# Altium PCB Industrial_IOT_Dev_Brd-v1.0.PcbDoc (part 6 of 8)
Units mil, origin at the board's own origin, x right, y up, seen from the top; angles counter-clockwise.
Board outline 6299.21 x 4724.41 mil, 4 copper layers (Top Layer, Layer 1, Layer 2, Bottom Layer), stack 62.047 mil thick; 376 components, 240 nets, 1129 pads, 635 vias.
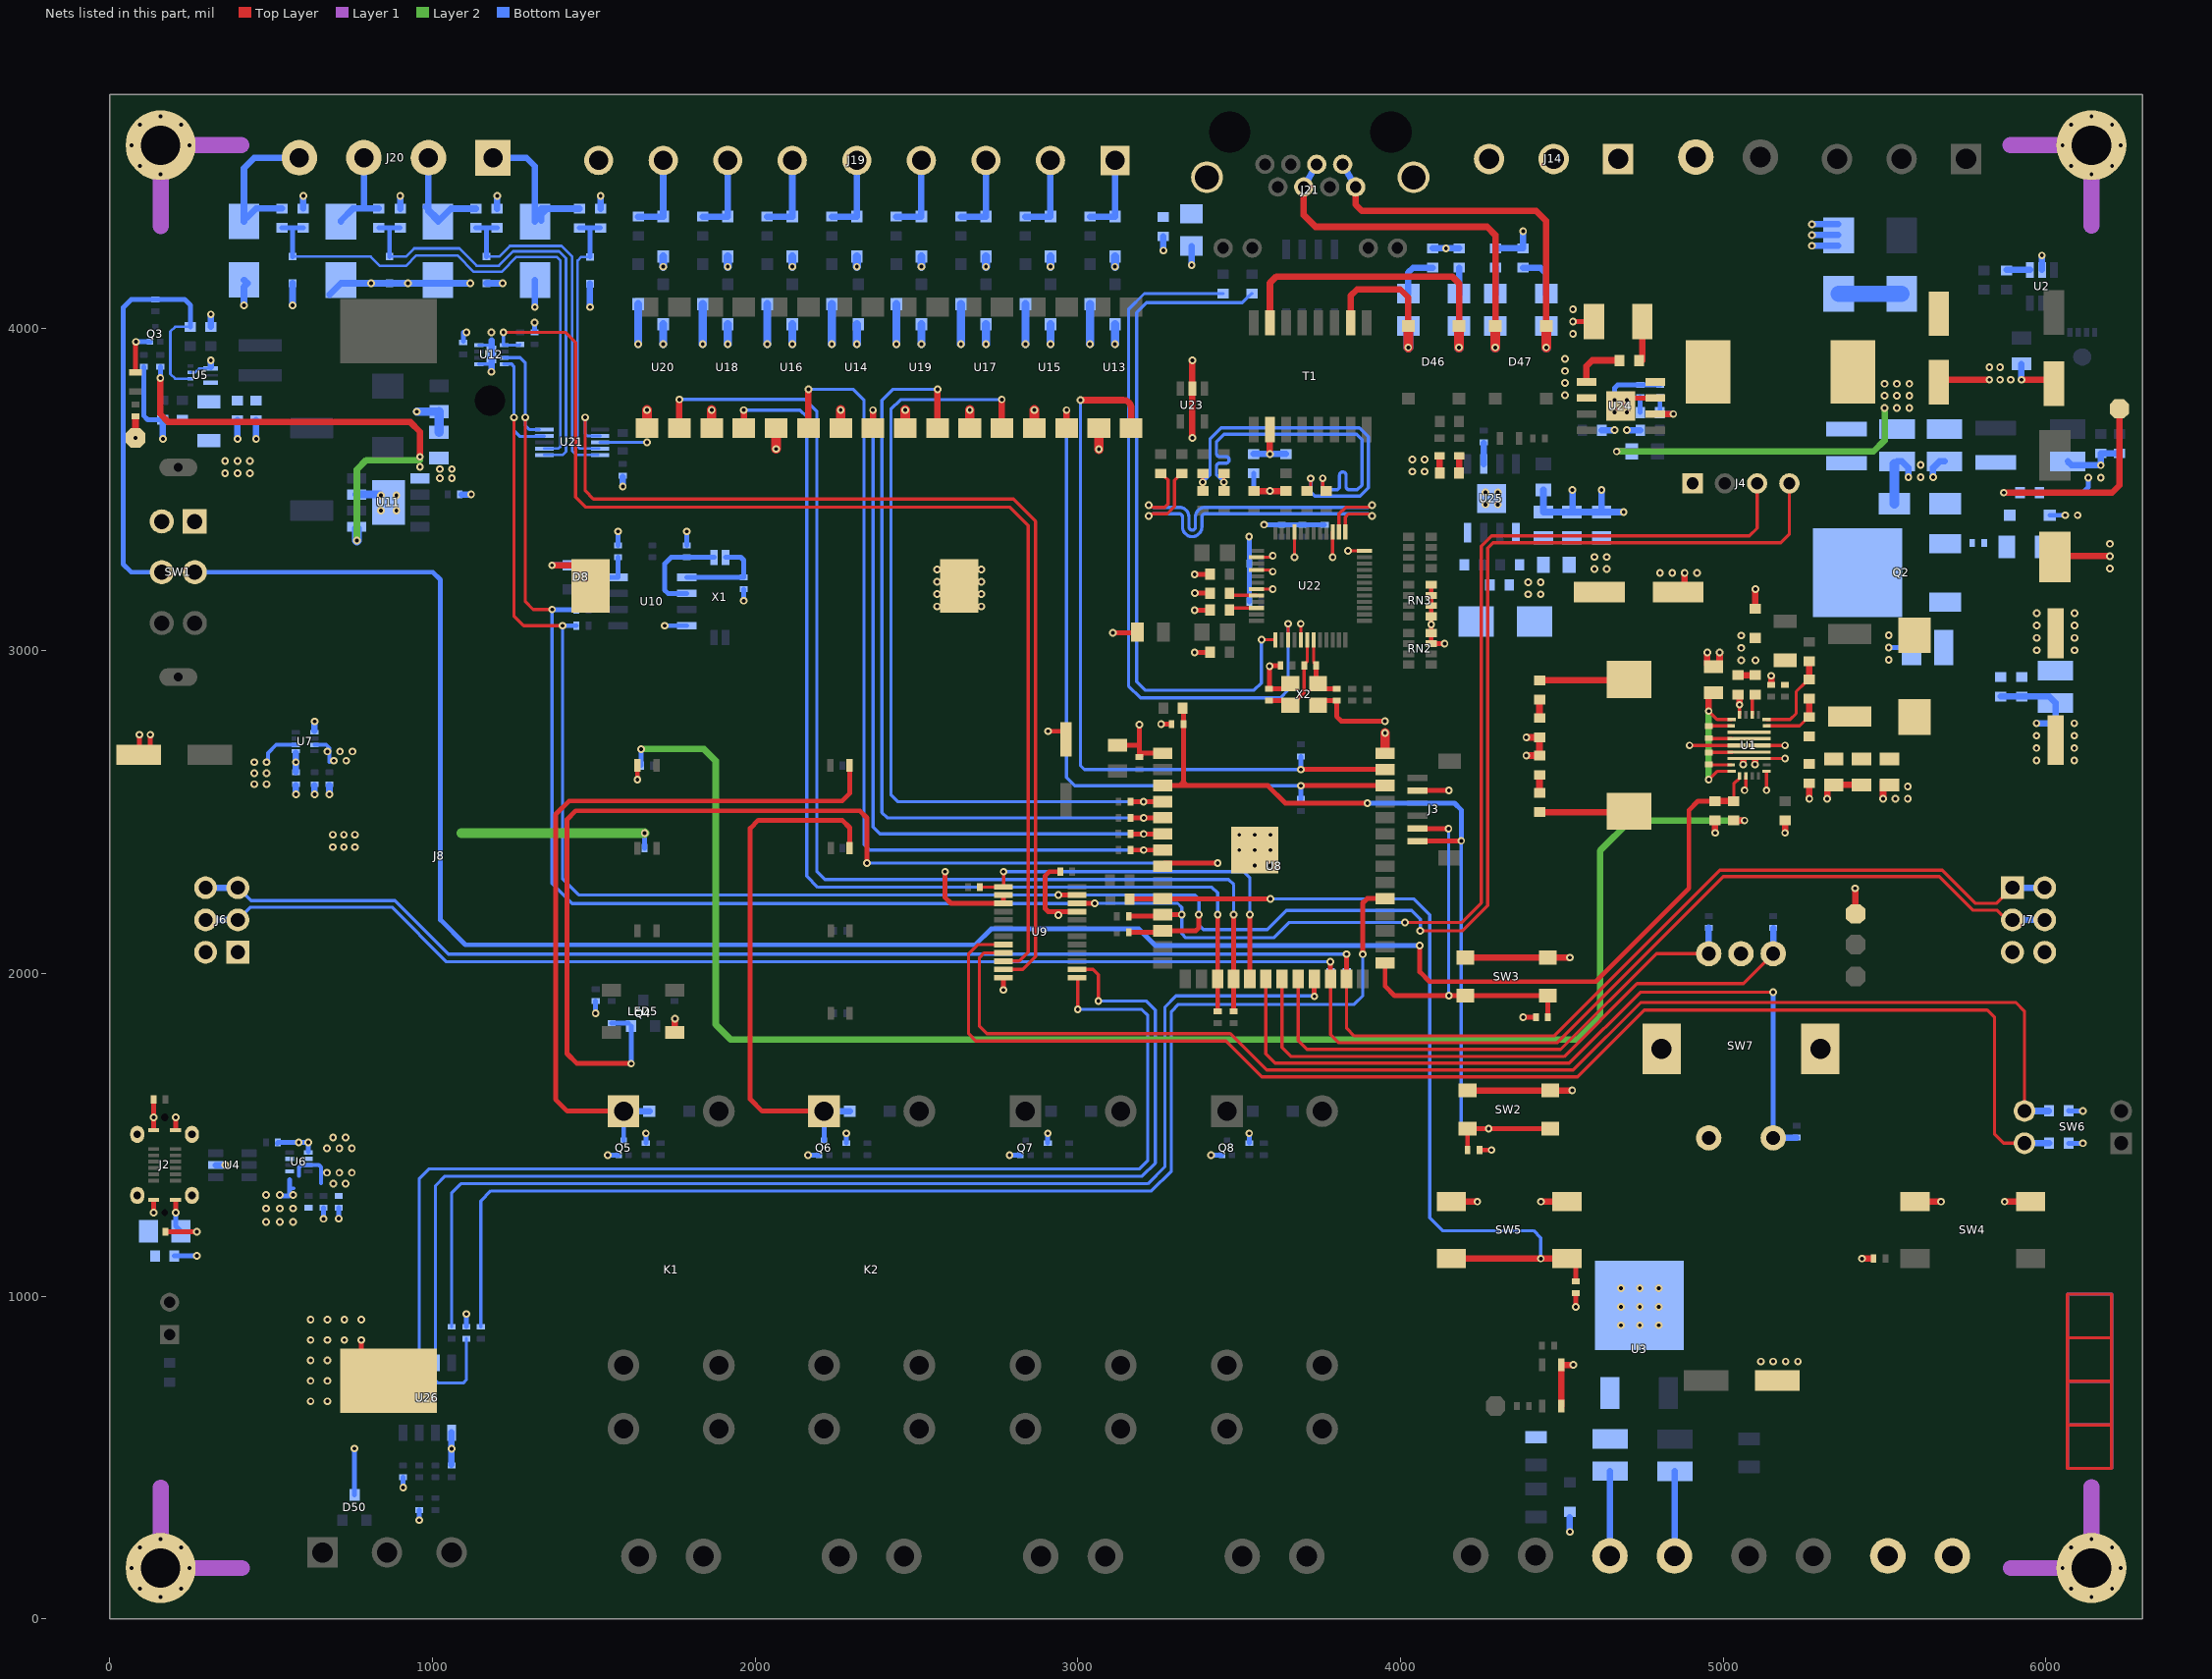
[diagram p5: the nets of this part, all layers, seen from the top]

## Via types
v1: diameter 23.62, hole 11.81, Top Layer to Bottom Layer, tented both sides, 635 vias

## Nets (pads, with @x,y where several pads share a name; then routed paths per layer and width w, separated by ;. In a path a pad name is that pad's centre, name@x,y a point inside that pad or via, vN(x,y) a via of type N, cw(c..) or ccw(c..) an arc to the next point about the centre after c; other vN are vias at no path point) (continued)
5V-BOOST: F4.2 R27.1 TP4.1 U7.6 | length 158.7
  Top Layer w20: TP4.1@80,3687.98 R27.1@80,3721.69
  Bottom Layer w12: v1@490.49,2654.94 490.49,2682.91 515.87,2708.3 U7.6@577,2708.3
  other v1: 448.4,2586.76 486.49,2586.76 448.4,2620.85 486.49,2620.85 448.4,2654.94 486.49,2654.94 357.72,3550.45 396,3550.45 434.28,3550.45 357.72,3587.82 396,3587.82 434.28,3587.82 80,3659.65
5V-OR: C42.1 R18.2 R23.1 R25.2 R47.1 U6.2 U6.7 U7.3 U7.5 U11.1 U11.5 | length 2318.3
  Top Layer w20: v1(157.06,3845.47) 157.06,3733.28 181.85,3708.49 931.82,3708.49 961.66,3678.65 v1(961.66,3600.96)
  Layer 2 w20: v1(766,3342) 766,3561.77 795.2,3590.96 v1@961.66,3590.96
  Layer 2 w30: 1089.17,2434.74 v1(1658.02,2434.74)
  Bottom Layer w8: U11.5@765.57,3384.41 765.97,3384.01 U11.5@765.97,3377.77
  Bottom Layer w12: U7.3@634.87,2708.3 671,2708.3 680.94,2698.36 680.94,2654.94
  Bottom Layer w15: v1(157.06,3845.47) R23.1@157.06,3880.25 ; R47.1@1657.7,2388.54 1657.86,2388.71 1657.86,2434.57 v1(1658.02,2434.74)
  Bottom Layer w20: R25.2@577,2625.05 v1(577,2654.94) U7.5@577,2684.17 ; v1@680.97,2554.98 R18.2@680.97,2583.33
  Bottom Layer w30: v1(766,3342) U11.5@766,3377.74
  other v1: 673.26,1458.3 711.84,1458.3 750.41,1458.3 692.27,1492.07 730.85,1492.07 691.82,2391.91 725.91,2391.91 760,2391.91 691.82,2430 725.91,2430 760,2430 681.01,2554.94 694.42,2659.4 732.99,2659.4 674.86,2688.17 713.43,2688.17 752,2688.17 1022.9,3535.17 1060.27,3535.17 1022.9,3563 1060.27,3563 961.66,3570.02
5V-PWR: D3.2 F2.2 R3.2 R17.2 R24.2 TP2.1 U6.3 U6.5 | length 323.4
  Top Layer w10: TP2.1@5409,2186 TP2.1@5410,2185
  Top Layer w20: TP2.1@5409,2186 v1(5409,2264)
  Bottom Layer w10: 557.41,1337.41 ccw(c560,1337.41) 560,1334.82 570.52,1334.82
  Bottom Layer w12: 586.34,1372.64 586.34,1395.97 cw(c596.6,1395.97) 596.6,1406.22 U6.3@615.28,1406.22 645.15,1406.22 cw(c645.15,1395.97) 655.41,1395.97 655.41,1350.02
  Bottom Layer w15: v1@527.91,1311 555.34,1311 ccw(c555.34,1313.06) 557.41,1313.06 557.41,1337.41 557.41,1361.76
  other v1: 485,1230.18 526.91,1230.18 568.29,1230.18 485,1272.09 526.91,1272.09 568.29,1272.09 485,1313.99 526.91,1313.99 568.29,1313.99 692.83,1349.07 731.4,1349.07 673.26,1382.84 711.84,1382.84 750.41,1382.84 5056.22,2970.84 5099.73,2970.84 5056.22,3009.12 5056.22,3047.41
24V: C8.1 C9.2 C10.2 C20.2 C21.2 D6.1 Q2.3 R1.2 R7.1 U1.7 | length 5014.5
  Top Layer w10: U1.7@5141.82,2666.02 v1(5191.66,2666.02)
  Top Layer w20: R1.2@5032.84,2474.1 v1(5065.92,2474.1) ; v1(5062.13,2647.51) 5062.13,2660.78 ; v1(5098.66,2647.52) 5098.66,2660.61
  Layer 2 w20: v1(1646.45,2695.5) 1841.5,2695.5 1878,2659 1878,1842 1925.13,1794.87 4547.87,1794.87 4618,1865 4618,2380 4712.1,2474.1 v1(5065.92,2474.1)
  Bottom Layer w15: R7.1@1646.45,2644.45 v1(1646.45,2695.5)
  other v1: 5971.78,3001.72 6089,3001.72 5971.78,3040 6089,3040 5971.78,3078.28 6089,3078.28 5971.78,3116.56 6089,3116.56
24V-ADAP: D2.2 D6.2 F1.2 R9.2 R10.2 TP1.1 | length 605.1
  Top Layer w20: v1(5869.29,3490) 6205,3490 6227.73,3512.73 TP1.1@6227.73,3750
24V-POE: F7.2 Q2.2
24V_EN: R1.1 R4.2 SW1.2 U1.1 | length 6450
  Top Layer w10: R1.1@5027.83,2534.1 R1.1@5032.84,2534.1 ; R1.1@5027.83,2539.11 R1.1@5030.34,2536.61 ; R1.1@5032.83,2539.11 5032.83,2587.93 U1.1@5049.88,2604.98
  Top Layer w15: v1(4059.83,2086.51) 4059.83,2005.17 4090,1975 4605,1975 4893.87,2263.87 4893.87,2506.22 4921.76,2534.11 R4.2@4975.04,2534.11
  Top Layer w20: R4.2@4975.04,2534.11 R1.1@5027.83,2534.1
  Bottom Layer w15: SW1.2@263.91,3243.53 1001.55,3243.53 1025.05,3220.03 1025.05,2166.21 1102.14,2089.12 2682.26,2089.12 2731.29,2138.15 3189.22,2138.15 3240.86,2086.51 v1(4059.83,2086.51)
485_DE: R123.1 U9.14 U26.3 | length 3910.5
  Top Layer w10: U9.14@2997.73,2012.85 3047.52,2012.85 3064,1996.37 v1(3064,1914.72)
  Bottom Layer w10: R123.1@1105,868.63 1105,740.46 1095.62,731.07 1017.53,731.07 1009.46,739.15 1009.46,1342.47 1038.85,1371.86 3199.08,1371.86 3239.96,1412.74 3239.96,1887.3 3212.55,1914.72 v1(3064,1914.72)
485_RE: U9.13 U26.2 | length 3625.5
  Top Layer w10: U9.13@2997.73,1987.26 3000,1984.99 v1(3000,1888.81)
  Bottom Layer w10: U26.2@959.46,793.4 959.46,1365.3 988.64,1394.49 3189.85,1394.49 3217,1421.64 3217,1870.27 3198.46,1888.8 v1@3000.01,1888.8
#RD_N: C55.2 R90.1 R94.2 | length 1156.3
  Top Layer w10: R94.2@3452.71,3495 3452.64,3495.07 v1(3452.64,3522.25) 3452.64,3549.39 C55.2@3452.71,3549.46 ; R90.1@3758.81,3495.21 v1@3758.81,3534.26
  Bottom Layer w10: v1(3452.64,3522.25) 3429.83,3545.06 3429.83,3546.56 3429.83,3571.56 cw(c3439.83,3571.56) 3439.83,3581.56 3458.89,3581.56 ccw(c3458.89,3591.56) 3458.89,3601.56 3439.83,3601.56 cw(c3439.83,3611.56) 3429.83,3611.56 3429.83,3642.98 3429.83,3648.19 3452.64,3671.01 3864.19,3671.01 3880.64,3654.56 3880.64,3513.55 3866.15,3499.05 3841.15,3499.05 cw(c3841.15,3509.05) 3831.15,3509.05 3831.15,3544.32 ccw(c3821.15,3544.32) 3811.15,3544.32 3811.15,3509.05 cw(c3801.15,3509.05) 3801.15,3499.05 3776.61,3499.05 3767.54,3499.05 3758.81,3507.78 v1@3758.81,3541.28
  other v1: 3759.02,3534.46
#RD_P: C56.2 R91.1 R93.2 | length 1154.6
  Top Layer w10: R93.2@3387.4,3495 C56.2@3387.39,3549.47 ; R91.1@3721.96,3495 v1(3721.96,3534.26)
  Bottom Layer w10: v1(3387.01,3522.25) 3409.83,3545.06 3409.83,3656.48 3444.35,3691.01 3872.48,3691.01 3900.64,3662.84 3900.64,3505.26 3874.43,3479.05 3734.83,3479.05 3722.14,3491.75 v1@3722.14,3539.95
#TD_N: R92.2 U22.1 | length 1146.6
  Top Layer w10: v1(3220,3417.82) cw(c3236.44,3401.38) 3229.41,3423.54 cw(c3236.44,3401.38) 3236.44,3424.63 3277.6,3424.63 3299.96,3446.99 3299.96,3515.56 3299.96,3528.66 3310.08,3538.78 3310.08,3539.48 3320.08,3549.48 R92.2@3322.58,3549.48 ; U22.1@3829.07,3368.6 3829.07,3414.6 3838.61,3424.14 3912.14,3424.14 v1(3912.14,3417.82)
  Bottom Layer w10: v1(3220,3417.82) ccw(c3220,3426.72) 3226.29,3420.43 cw(c3236.44,3410.28) 3236.44,3424.63 3257.02,3424.63 3314.51,3424.63 cw(c3314.51,3414.63) 3324.51,3414.63 3324.51,3383.96 ccw(c3354.51,3383.96) 3384.51,3383.96 3384.51,3414.63 cw(c3394.51,3414.63) 3394.51,3424.63 3409.51,3424.63 3896.83,3424.63 cw(c3896.83,3413) 3905.05,3421.23 3905.85,3420.43 ccw(c3912.14,3426.72) v1(3912.14,3417.82)
#TD_P: R95.2 U22.2 | length 1123.8
  Top Layer w10: v1(3220,3451.44) ccw(c3236.44,3467.89) 3229.41,3445.72 ccw(c3236.44,3467.89) 3236.44,3444.63 3269.32,3444.63 3279.96,3455.27 3279.96,3507.28 3279.96,3529.23 3269.83,3539.35 3269.83,3539.48 3259.83,3549.48 R95.2@3257.33,3549.48 ; 3809.07,3392.62 3809.07,3424.28 3829.92,3445.12 3912.14,3445.12 v1(3912.14,3451.44)
  Bottom Layer w10: v1(3220,3451.44) cw(c3220,3442.54) 3226.29,3448.84 ccw(c3236.44,3458.99) 3236.44,3444.63 3257.02,3444.63 3314.51,3444.63 cw(c3314.51,3414.63) 3344.51,3414.63 3344.51,3383.96 ccw(c3354.51,3383.96) 3364.51,3383.96 3364.51,3414.63 cw(c3394.51,3414.63) 3394.51,3444.63 3409.51,3444.63 3896.83,3444.63 ccw(c3896.83,3456.26) v1@3905.05,3448.03 ; v1@3905.05,3448.04 3905.85,3448.84 cw(c3912.14,3442.54) v1(3912.14,3451.44)
ACTLED: R101.1 U22.27 | length 2260
  Top Layer w10: U22.27@3651.91,3033.95 v1@3651.91,3088.63
  Bottom Layer w10: R101.1@3450.32,4106.89 3206.1,4106.89 3157.33,4058.12 3157.33,2891.33 3194.23,2854.43 3628.16,2854.43 3651.53,2877.8 v1(3651.53,3084.01)
ADC_RDY: U9.11 U21.2 | length 3226.9
  Top Layer w10: v1(1473.66,3723) 1473.66,3495.43 1499.09,3470 2800.35,3470 2868.98,3401.37 2868.98,2052.42 2829.41,2012.85 U9.11@2769.38,2012.85
  Bottom Layer w10: v1(1473.66,3723) 1473.66,3671.82 1479.52,3665.96 U21.2@1520.14,3665.96
ADDR-1: R29.2 SW6.4 U9.8 | length 4239.9
  Top Layer w10: U9.8@2769.38,2089.62 2689.39,2089.62 2661.56,2061.79 2661.56,1813.13 2683.92,1790.77 3459.74,1790.77 3570.51,1680 4548.49,1680 4754.88,1886.39 5818.22,1886.39 5840.88,1863.72 5840.88,1501.74 5868.53,1474.1 SW6.4@5933.53,1474.1
  Bottom Layer w20: SW6.4@5933.53,1474.1 R29.2@6010,1474.1
ADDR-2: R30.2 SW6.3 U9.9 | length 4071.7
  Top Layer w10: U9.9@2769.38,2064.03 2709.96,2064.03 2695,2049.07 2695,1836.86 2718.05,1813.81 3472.56,1813.81 3585.5,1700.87 4535.19,1700.87 4744.57,1910.25 5906.73,1910.25 5933.53,1883.45 SW6.3@5933.53,1574.1
  Bottom Layer w10: R30.2@6009.1,1574.1 R30.2@6010,1575
  Bottom Layer w20: SW6.3@5933.53,1574.1 R30.2@6009.1,1574.1
AN0: D39.2 R80.1 R82.2 U21.4 | length 843.3
  Bottom Layer w8: D39.2@1488.24,4220.26 1460.88,4220.26 1449.85,4209.23 1449.85,3633.96 1457.22,3626.59 U21.4@1517.24,3626.59
  Bottom Layer w15: R80.1@1455.29,4310.14 1488.24,4310.14 ; D39.2@1488.24,4221.42 1488.24,4310.14 ; R82.2@1521.2,4310.14 1488.24,4310.14
AN1: D43.2 R84.1 R86.2 U21.5 | length 1135.8
  Bottom Layer w8: D43.2@1167.75,4221.6 1207.44,4221.6 1240.4,4254.56 1400.35,4254.56 1432.85,4222.07 1432.85,3619.64 1445.59,3606.9 U21.5@1514.24,3606.9
  Bottom Layer w15: R84.1@1134.8,4310.14 1167.75,4310.14 ; D43.2@1167.75,4221.6 1167.75,4310.14 ; R86.2@1200.71,4310.14 1167.75,4310.14
AN2: D40.2 R81.1 R83.2 U21.6 | length 1431.5
  Bottom Layer w8: D40.2@867.26,4221.6 918.24,4221.6 943.43,4246.79 1083.43,4246.79 1136.96,4193.26 1205.69,4193.26 1250.22,4237.79 1392.18,4237.79 1413.91,4216.05 1413.91,3616.91 1403.91,3606.9 U21.6@1346.91,3606.9
  Bottom Layer w15: R81.1@834.3,4310.14 867.26,4310.14 ; D40.2@867.26,4221.6 867.26,4310.14 ; R83.2@900.21,4310.14 867.26,4310.14
AN3: D44.2 R85.1 R87.2 U21.7 | length 1683.9
  Bottom Layer w8: D44.2@566.76,4221.6 809.26,4221.6 838.1,4192.76 917.73,4192.76 950.28,4225.31 1077.34,4225.31 1128.11,4174.54 1214.16,4174.54 1260.4,4220.79 1385.14,4220.79 1396.91,4209.01 1396.91,3633.05 1390.46,3626.59 U21.7@1346.91,3626.59
  Bottom Layer w15: R85.1@533.81,4310.33 566.76,4310.33 ; D44.2@566.76,4221.6 566.76,4310.33 ; R87.2@599.72,4310.33 566.76,4310.33
ANALOG_IN_1: D37.2 J20.1 R80.2 | length 520
  Bottom Layer w20: J20.1@1187.67,4527.64 1291.83,4527.64 1317.67,4501.8 D37.2@1317.67,4330.03 ; D37.2@1317.67,4332.9 D37.2@1337.67,4352.9 ; D37.2@1337.67,4332.9 D37.2@1337.67,4352.9 ; R80.2@1455.29,4370.14 D37.2@1354.91,4370.14 ; D37.2@1337.67,4352.9 D37.2@1354.91,4370.14 ; D37.2@1337.67,4352.9 1337.67,4370.14 D37.2@1354.91,4370.14
ANALOG_IN_2: D41.2 J20.2 R84.2 | length 404.5
  Bottom Layer w20: D41.2@979.39,4375.14 979.93,4375.14 D41.2@987.67,4367.41 ; J20.2@987.67,4527.64 D41.2@987.67,4367.41 ; R84.2@1134.8,4370.14 1057.3,4370.14 D41.2@1018.29,4331.14 ; D41.2@987.67,4367.41 987.67,4361.77 D41.2@1017.18,4332.26 ; D41.2@987.67,4367.41 1017.18,4337.9 D41.2@1017.18,4332.26 ; D41.2@1017.18,4332.26 D41.2@1017.18,4330.03 D41.2@1018.29,4331.14 ; D41.2@1017.18,4332.26 D41.2@1018.29,4331.14
ANALOG_IN_3: D38.2 J20.3 R81.2 | length 293.4
  Bottom Layer w20: D38.2@716.68,4330.03 716.68,4332.97 753.93,4370.21 787.67,4370.21 ; J20.3@787.67,4527.64 787.67,4370.21 ; R81.2@834.25,4370.21 787.67,4370.21
ANALOG_IN_4: D42.2 J20.4 R85.2 | length 473.1
  Bottom Layer w20: D42.2@416.19,4330.21 416.19,4340.33 416.19,4495.83 448,4527.64 J20.4@587.67,4527.64 ; D42.2@423.44,4340.33 453.44,4370.33 R85.2@533.81,4370.33
BAT_ALERT: R50.2 U9.10 U12.5 | length 3658
  Top Layer w10: v1(1220.21,3986.5) 1413.5,3986.5 1443.82,3956.18 1443.82,3476.18 1475,3445 2790,3445 2846.34,3388.66 2846.34,2066.34 2818.44,2038.44 U9.10@2769.38,2038.44
  Bottom Layer w8: R50.2@1269.85,3947.35 R50.2@1272,3949.5
  Bottom Layer w10: v1@1218.21,3986.5 1220.1,3984.6 1220.1,3948.25 1221.01,3947.35 U12.5@1222,3947.35 R50.2@1269.85,3947.35
BAT_EN: R16.2 R19.2 SW1.5 U5.5 | length 1485.8
  Bottom Layer w8: U5.5@250.28,3843.26 202.83,3843.26 188,3858.09 188,3989.01 202.83,4003.84 R16.2@250.28,4003.84
  Bottom Layer w15: SW1.5@161.55,3243.53 66.77,3243.53 41.95,3268.35 41.95,4063.79 66.66,4088.5 R19.2@141.31,4088.5 232.42,4088.5 250.28,4070.64 R16.2@250.28,4003.84
BCK_BUT: C38.2 R40.1 SW5.3 SW5.4 U8.10 | length 2746.8
  Top Layer w15: R40.1@3157.58,2230.53 3158.58,2231.53 U8.10@3262.29,2231.53 ; U8.10@3263.26,2227.49 3266.77,2231 v1(3597,2231) ; C38.2@4543.58,1046.78 SW5.4@4543.59,1107.87
  Top Layer w20: SW5.3@4157.45,1116.68 v1(4434.65,1116.68) SW5.4@4515.71,1116.68
  Bottom Layer w10: v1(3597,2231) 4041.98,2231 4090.84,2182.14 4090.84,1242.89 4130.51,1203.21 4412.43,1203.21 4434.65,1181 v1(4434.65,1116.68)
CDB: R107.1 U25.6 | length 65.2
  Bottom Layer w20: U25.6@4257.92,3578.66 R107.1@4257.92,3643.9
DI_1: R64.1 U8.39 U13.4 | length 2356
  Top Layer w10: U8.39@3951.99,2632.25 U8.39@3952.27,2632.53
  Top Layer w15: v1@3691.26,2632.26 U8.39@3951.98,2632.26
  Top Layer w20: v1(3008.31,3776.77) 3140.57,3776.77 cw(c3140.57,3752.03) 3165.31,3752.03 U13.4@3165.31,3689.94 ; v1(3691,2632) v1@3691.26,2632.26
  Bottom Layer w10: v1(3008.31,3776.77) 3008.31,2644.19 3020.5,2632 v1(3691,2632)
  Bottom Layer w15: v1(3691,2632) R64.1@3691,2673
DI_2: R68.1 U8.38 U15.4 | length 2232.7
  Top Layer w15: v1@3691.26,2582.26 U8.38@3952.01,2582.26
  Top Layer w20: U15.4@2965.31,3689.94 v1(2965.31,3745.84) ; v1(3691,2582) v1@3691.26,2582.26 ; U8.38@3952.01,2582.26 U8.38@3952.13,2582.39
  Bottom Layer w10: v1(2965.31,3745.84) 2965.31,2607.69 2991,2582 v1(3691,2582)
  Bottom Layer w15: R68.1@3691,2541 v1(3691,2582)
DI_3: R72.1 U8.4 U17.4 | length 2531.6
  Top Layer w15: R72.1@3163.08,2532.03 3163.2,2532.15 3203.71,2532.15 v1(3203.84,2532.28) 3263.04,2532.28 U8.4@3263.29,2532.53
  Top Layer w20: v1(2764.36,3778.82) 2764.36,3690.89 U17.4@2765.31,3689.94
  Bottom Layer w10: v1(2764.36,3778.82) 2763.62,3778.07 2450.57,3778.07 2420.89,3748.39 2420.89,2554.92 2443.53,2532.28 v1(3203.84,2532.28)
DI_4: R76.1 U8.5 U19.4 | length 2501.6
  Top Layer w15: R76.1@3163.08,2482.53 v1(3204.09,2482.53) U8.5@3263.29,2482.53
  Top Layer w20: U19.4@2565.31,3689.94 v1(2565.31,3810)
  Bottom Layer w10: v1(2565.31,3810) 2426.62,3810 2393.19,3776.57 2393.19,2498.93 2409.59,2482.53 v1(3204.09,2482.53)
DI_5: R65.1 U8.6 U14.4 | length 2295.9
  Top Layer w15: R65.1@3163.07,2432.53 v1(3204.09,2432.53) U8.6@3263.29,2432.53
  Top Layer w20: U14.4@2365.31,3689.94 v1(2365.31,3745.84)
  Bottom Layer w10: v1(2365.31,3745.84) 2365.31,2453.55 2386.33,2432.53 v1(3204.09,2432.53)
DI_6: R69.1 U8.7 U16.4 | length 2657
  Top Layer w15: R69.1@3163.08,2382.53 v1(3204.09,2382.53) U8.7@3263.29,2382.53
  Top Layer w20: U16.4@2165.31,3689.94 v1(2165.31,3810)
  Bottom Layer w10: v1(2165.31,3810) 2304.65,3810 2337.23,3777.42 2337.23,2400.28 2354.98,2382.53 v1(3204.09,2382.53)
DI_7: R73.1 U8.17 U18.4 | length 3345.2
  Top Layer w15: 3433.4,1933.8 3433.4,1883.18 R73.1@3433.81,1882.77 ; 3433.46,1933.8 v1(3433.46,2182.53)
  Top Layer w20: v1(1965,3745.84) 1965,3690.25 U18.4@1965.31,3689.94
  Bottom Layer w10: v1(1965,3745.84) 2139.16,3745.84 2159.84,3725.16 2159.84,2301.85 2194.15,2267.54 3415.92,2267.54 3433.46,2250 v1(3433.46,2182.53)
DI_8: R77.1 U8.18 U20.4 | length 3656.4
  Top Layer w15: 3482.98,1924.11 v1(3482.98,2182.53) ; R77.1@3483.1,1883.47 3483.1,1923.98
  Top Layer w20: U20.4@1765.31,3689.94 v1(1765.31,3778.82)
  Bottom Layer w10: v1(1765.31,3778.82) 2153.99,3778.82 2191.5,3741.3 2191.5,2315.51 2215.98,2291.02 3467.48,2291.02 3482.98,2275.53 v1(3482.98,2182.53)
ENC_BUT: R43.1 SW7.D U8.20 | length 2435.4
  Top Layer w10: U8.20@3582.98,1983.32 3582.98,1751.01 3611.83,1722.16 4522.95,1722.16 4742.79,1942 v1(5155,1942)
  Bottom Layer w10: v1(5155,1942) v1@5155,1947 ; SW7.D@5155.1,1490.69 SW7.D@5155.1,1490.69
  Bottom Layer w15: v1(5155,1942) 5155.05,1941.95 SW7.D@5155.1,1490.69
  Bottom Layer w20: SW7.D@5155.1,1490.69 R43.1@5226.86,1490.69
ENC_CHA: R41.1 SW7.A U8.21 | length 1957.8
  Top Layer w10: U8.21@3632.98,1983.32 3632.98,1770.85 3661.19,1742.64 4506.83,1742.64 4733.12,1968.93 5062.47,1968.93 SW7.A@5155.1,2061.56
  Bottom Layer w20: SW7.A@5155.1,2061.06 R41.1@5155.1,2140.5
ENC_CHB: R42.1 SW7.B U8.22 | length 1678.1
  Top Layer w10: U8.22@3682.98,1983.32 3682.98,1792 3710.22,1764.75 4496.09,1764.75 4792.9,2061.56 SW7.B@4955.1,2061.56
  Bottom Layer w20: SW7.B@4955.1,2061.06 R42.1@4955.1,2141.5
ESP-EN: C29.2 C30.2 J3.6 R28.1 SW2.3 SW2.4 U8.3 | length 2760.4
  Top Layer w15: U8.3@3263.29,2582.53 3263.29,2582 3309,2582 ; R28.1@3325,2822 cw(c3325,2819.5) 3327.5,2819.5 C29.2@3327.5,2772.58 3327.5,2600.5 ; 3346,2582 cw(c3346,2600.5) 3327.5,2600.5 ; v1(3897.4,2527.86) 3643.14,2527.86 3589,2582 3309,2582 ; J3.6@4053.02,2409.75 4053.78,2410.5 4187.53,2410.5 v1(4188.29,2411.26) ; SW2.3@4207.62,1519.74 SW2.3@4207.88,1519.47 ; C30.2@4207.89,1453.21 SW2.3@4207.88,1519.47 ; SW2.4@4463.79,1519.47 v1(4273.14,1519.47) SW2.3@4207.88,1519.47 ; 3309,2582 ccw(c3309,2600.5) 3327.5,2600.5
  Bottom Layer w10: v1(4188.29,2411.26) 4188.29,1533.48 4202.29,1519.47 v1(4273.14,1519.47)
  Bottom Layer w15: v1(3897.4,2527.86) 4167.66,2527.86 4188.29,2507.23 v1(4188.29,2411.26)
EXP_INT: R39.1 U8.19 U9.1 | length 1204.6
  Top Layer w10: R39.1@2696.72,2268.08 2768.71,2268.08 2770,2269.37 v1(2770,2315.69)
  Top Layer w15: U8.19@3532.98,1983.32 v1(3532.98,2182.53)
  Bottom Layer w10: v1(2770,2315.69) 3514.31,2315.69 3532.98,2297.02 v1(3532.98,2182.53)
GND: C2.2 C3.2 C4.1 C5.1 C6.1 C7.1 C8.2 C9.1 C10.1 C11.1 C12.1 C13.1 C14.1 C16.1 C18.1 C19.1 C20.1 C21.1 C22.2 C23.1 C24.1 C25.1 C26.1 C27.2 C28.2 C29.1 C30.1 C31.2 C32.1 C33.2 C34.1 C35.1 C36.2 C37.2 C38.1 C39.1 C40.1 C41.1 C42.2 C43.1 C44.1 C45.2 C46.1 C47.1 C48.2 C49.2 C50.2 C51.2 C52.2 C53.2 C54.1 C57.1 C58.1 C59.1 C62.1 C63.1 C64.1 C65.1 C67.1 C68.1 C69.1 C73.2 C74.1 C75.1 C76.1 C77.1 C78.2 C79.2 C81.1 C82.2 C86.2 D2.1 D3.1 D4.2 D5.1 D7.2 D13.2 D14.2 D15.1 D16.1 D17.1 D18.1 D19.2 D20.2 D21.1 D22.1 D23.1 D24.1 D25.2 D26.2 D27.1 D28.1 D29.1 D30.1 D31.2 D32.2 D33.1 D34.1 D35.1 D36.1 D37.1 D38.1 D39.1 D40.1 D41.1 D42.1 D43.1 D44.1 D48.2 D50.3 J1.1 J2.A1 J2.A12 J2.B1 J2.B12 J3.2 J4.1 J5.2 J6.1 J6.2 J7.5 J7.6 J8.1 J14.1 J14.2 J14.3 J17.1 J17.2 J18.1 J18.2 J19.9 LED1.2 LED2.2 LED3.2 LED4.2 LED5.3 pad.MH1 Q3.2 Q5.2 Q6.2 Q7.2 Q8.2 R4.1 R5.1 R10.1 R11.1 R13.2 R14.2 R20.1 R21.1 R22.1 R24.1 R25.1 R26.1 R29.1 R30.1 R49.1 R51.1 R56.1 R57.1 R58.1 R59.1 R82.1 R83.1 R86.1 R87.1 R100.1 R103.1 R104.1 R105.1 R112.2 R113.1 R114.1 R120.1 R121.1 R123.2 R125.1 R126.1 R131.1 R132.1 RN2.3 RN2.4 RN3.1 RN3.2 RN3.3 RN3.4 SW1.1 SW1.4 SW2.1 SW2.2 SW3.1 SW3.2 SW4.1 SW4.2 SW5.1 SW5.2 SW7.C SW7.E SW7.F SW7.G U1.2 U1.5 U1.9 U1.17 U2.2 U3.2 U4.2 U5.1 U5.6 U6.1 U7.1 U8.1 U8.40 U8.41 U9.2 U9.3 U9.12 U9.21 U10.4 U11.7 U11.9 U12.1 U12.4 U12.9 U13.3 U14.3 U15.3 U16.3 U17.3 U18.3 U19.3 U20.3 U21.3 U22.3 U22.9 U22.14 U22.16 U22.19 U22.29 U22.48 U23.2 U24.7 U24.9 U26.5 X2.2 X2.4 | length 21432.7
  Top Layer w10: U22.19@3553.48,3191.43 v1(3604.05,3191.43) ; U22.16@3553.48,3250.49 v1@3604.05,3250.49 ; U22.14@3553.48,3289.86 v1@3604.05,3289.86 ; v1(3671.59,3289.86) U22.9@3671.59,3368.6 ; U22.29@3691.28,3033.95 v1@3691.28,3088.63 ; v1(3789.7,3289.86) U22.3@3789.7,3368.6 ; v1(3837.56,3309.54) U22.48@3888.13,3309.54 ; v1(4895.63,2706.96) U1.9@5079.89,2706.96 ; U1.17@5050.36,2801.45 v1@5050.36,2832.56 ; v1(5065.92,2568.01) 5065.92,2571.69 5070.05,2575.82 U1.2@5070.05,2612.47 ; v1(5134.03,2568.01) U1.5@5134.03,2624.58 ; U1.9@5134.03,2706.96 v1(5191.66,2706.96) ; 6066.78,601.56 6066.78,736.56 ; 6066.78,601.56 6066.78,466.56 6203.21,466.56 6203.21,601.56 ; 6066.78,601.56 6203.21,601.56 ; 6066.78,736.56 6066.78,871.56 ; 6066.78,736.56 6203.21,736.56 ; 6066.78,871.56 6066.78,1006.56 6203.21,1006.56 6203.21,871.56 ; 6066.78,871.56 6203.21,871.56 ; 6203.21,601.56 6203.21,736.56 ; 6203.21,736.56 6203.21,871.56
  Top Layer w15: LED4.2@80,3862.88 80.62,3863.5 80.62,3956.78 v1(81.24,3957.4) ; v1(91.94,2740.02) 91.94,2680.18 C28.2@89.76,2678 102.04,2678 126.03,2702 v1(126.03,2740.02) ; v1(136.23,1259.38) J2.A1@136.23,1295.22 ; J2.A12@136.23,1518.81 v1(136.23,1554.65) R14.2@136.23,1610 ; R13.2@173.23,1200 v1(270.24,1200) ; v1(204.34,1259.38) J2.B12@204.34,1295.22 ; J2.B1@204.34,1518.81 v1(204.34,1554.65) ; v1(779.73,864.48) 779.73,822.07 J8.1@863.9,737.91 ; v1(1635.32,2600.85) LED1.2@1635.32,2646.07 ; v1(2589,2315.69) 2589,2235.31 2606.73,2217.58 U9.3@2769.38,2217.58 U9.2@2769.38,2243.17 ; v1(2769.38,1949) U9.12@2769.38,1987.26 ; v1@2906,2749 cw(c2907.8,2749) v1(2907.8,2750.8) C31.2@2963.57,2750.8 ; C36.2@2946,2315.69 2911.52,2315.69 2899.02,2303.19 2899.02,2201.01 2908.05,2191.98 2940,2191.98 U9.21@2997.73,2191.98 ; v1(3109,3056) C46.1@3185,3056 ; C32.1@3123.08,2707.53 3190.72,2707.53 ; v1(3191,2771) 3191,2707.53 3190.72,2707.53 ; v1(3258.35,2772.58) C29.1@3290.5,2772.58 ; U8.1@3262.96,2682.87 3195.72,2682.87 3195.72,2671.9 3194.22,2670.4 C33.2@3190.72,2670.4 3190.72,2707.53 ; v1(3361.81,2995) C47.1@3410,2995 ; v1(3361.81,3126.08) C62.1@3409.81,3126.08 ; v1@3361.81,3178.05 cw(c3362.6,3178.05) v1(3362.6,3178.84) C63.1@3409.81,3178.84 ; v1(3361.81,3237.1) C54.1@3409.81,3237.1 ; C64.1@3592.66,2882.79 C64.1@3593,2882.79 ; v1@3593.58,2951.44 v1(3594.5,2952.37) ; C48.2@3628.29,2954.28 3627.34,2953.32 3595.46,2953.32 v1(3594.5,2952.37) ; X2.4@3658.51,2897.74 3643.55,2882.79 C64.1@3593,2882.79 ; X2.2@3745.12,2830.81 3760.09,2845.78 C65.1@3802.15,2845.78 3802.15,2796.29 3816.44,2782 v1(3951.98,2782) ; J3.2@4053.02,2567.23 v1(4150.01,2567.23) ; RN3.4@4095.26,3204.91 RN3.3@4095.26,3171.84 RN3.2@4095.26,3140.34 RN3.1@4095.26,3107.27 v1(4095.26,3081.35) RN2.4@4095.26,3055.44 RN2.3@4095.26,3022.37 v1(4136.47,3022.37) ; C30.1@4244.89,1453.21 v1(4282.05,1453.21) ; v1(4380,1865) C34.1@4419.74,1865 ; v1(4534.49,4020.31) 4599.11,4020.31 D48.2@4599.42,4020 ; v1(4543.58,967.37) C38.1@4543.58,1009.78 ; U24.9@4682.73,3758.44 4707.73,3783.44 U24.7@4789.03,3783.44 ; C64.1@3593,2882.79 3594.5,2884.29 v1(3594.5,2952.37)
  Top Layer w20: J8.1@863.9,737.91 J8.1@884.47,758.48 ; LED5.3@1751.59,1811.81 LED5.3@1751.59,1817.81 v1(1751.59,1860) ; v1(3355,3660.02) U23.2@3355,3812.71 v1(3355,3900) ; C58.1@3545.41,3495 R103.1@3645.6,3495 ; SW5.1@4157.45,1293.85 4157.77,1293.53 4238.02,1293.53 v1(4238.34,1293.21) ; SW3.2@4200.84,2049.38 SW3.1@4456.74,2049.38 v1(4525,2049.38) ; SW2.2@4207.88,1637.58 SW2.1@4463.79,1637.58 v1(4532.05,1637.58) ; v1(4390,2675.34) C81.1@4430.67,2675.34 C82.2@4430.66,2731.82 v1(4390,2731.82) ; v1(4434.83,1293.2) 4435.14,1293.52 SW5.2@4515.39,1293.52 ; LED3.2@4497.71,659.95 LED2.2@4497.72,787.4 ; LED2.2@4502.23,787.4 v1(4535.94,787.4) ; C86.2@4860.05,3182 4864.24,3182 4880.51,3198.26 v1(4880.51,3241.11) ; C16.1@4950.77,2957.48 v1@4950.77,2994.95 ; v1(4975.04,2436.01) R4.1@4975.04,2474.11 ; C16.1@4989,2957.53 v1(4989,2995) ; v1(5050.56,2832.76) R125.1@5050.56,2860.47 ; 5099.73,3147.01 v1(5099.73,3191) ; R5.1@5148.95,2897.71 v1(5148.95,2922.67) ; v1(5191.66,2436) R126.1@5191.66,2474.1 ; v1(5266.72,2541.71) C11.1@5266.72,2589.58 C11.1@5266.72,2594.58 ; v1(5322.37,2541.71) C12.1@5322.37,2594.58 ; C12.1@5342.26,2584.58 C13.1@5428.79,2584.58 ; v1(5430,1116.68) C35.1@5463.71,1116.68 ; v1(5495.44,2541.72) C14.1@5495.44,2594.59 ; SW4.1@5594.79,1293.53 5675.04,1293.53 v1(5675.36,1293.21) ; C73.2@5675.5,3840 v1(5824.8,3840) ; v1(5871.85,1293.2) 5872.16,1293.52 SW4.2@5952.42,1293.52 ; v1(5924.33,3840) C3.2@6013.02,3840 ; C2.2@6029.96,3293.28 v1(6198,3293.28)
  Top Layer w30: U20.3@1665.31,3690 v1(1665.31,3745.84) ; U18.3@1865.31,3690 v1(1865.31,3745.84) ; v1(2065.31,3625.31) U16.3@2065.31,3690 ; U14.3@2265.31,3690 v1(2265.31,3745.84) ; U19.3@2465.31,3690 v1(2465.31,3745.84) ; U17.3@2665.31,3690 v1(2665.31,3745.84) ; U15.3@2865.31,3690 v1(2865.31,3745.84) ; v1(3065.31,3624.48) U13.3@3065.31,3689.94 U13.3@3065.31,3690 ; U8.40@3952.27,2682.53 v1(3952.27,2745.28)
  Layer 1 w50: 157.85,407.33 v1(157.85,247.85) pad.MH1@157.85,157.85 v1(247.85,157.85) 408.78,157.85 ; 157.85,4315.63 v1(157.85,4476.56) pad.MH1@157.85,4566.56 v1(247.85,4566.56) 407.33,4566.56 ; 5890.43,4566.56 v1(6051.36,4566.56) pad.MH1@6141.36,4566.56 v1(6141.36,4476.56) 6141.36,4317.08 ; 5891.89,157.85 v1(6051.37,157.85) pad.MH1@6141.37,157.85 v1(6141.37,247.85) 6141.37,408.78
  Bottom Layer w8: U5.6@250.28,3862.95 265.44,3862.95 277.25,3874.76 U5.1@313.27,3874.76 ; U11.9@837.5,3484.41 v1(840.34,3481.58) ; C42.2@1020,3677 C42.2@1021,3678 ; C43.1@1020.93,3740.93 C43.1@1021,3741 ; U21.3@1520.14,3646.27 U21.3@1520.36,3646.05 ; v1@1665.09,3746.05 v1(1665.31,3745.84) ; D4.2@5356.71,4288.28 D4.2@5357.73,4287.27 ; C7.1@6170,3611.65 C7.1@6170.26,3611.92
  Bottom Layer w10: U12.1@1144.05,3888.29 1180.66,3888.29 ; U12.4@1144.05,3947.35 1180.66,3947.35 ; U21.3@1520.14,3646.27 v1(1664.87,3646.27) ; 6066.78,601.56 6066.78,736.56 ; 6066.78,601.56 6066.78,466.56 6203.21,466.56 6203.21,601.56 ; 6066.78,601.56 6203.21,601.56 ; 6066.78,736.56 6066.78,871.56 ; 6066.78,736.56 6203.21,736.56 ; 6066.78,871.56 6066.78,1006.56 6203.21,1006.56 6203.21,871.56 ; 6066.78,871.56 6203.21,871.56 ; 6203.21,601.56 6203.21,736.56 ; 6203.21,736.56 6203.21,871.56
  Bottom Layer w15: v1(81.24,3957.4) 81.64,3957.8 125.16,3957.8 Q3.2@125.56,3958.2 ; 105.45,3845.47 105.52,3845.55 R26.1@105.6,3880.25 R26.1@105.6,3880.25 105.6,3728.45 118.05,3716 R20.1@164.9,3716 ; R11.1@200.55,1125 v1(270.24,1125) ; v1(204.34,1259.38) 204.34,1217.96 C23.1@220.28,1202.02 222.15,1200.15 266.26,1200.15 v1@266.26,1201.65 ; U4.2@328.08,1405.8 U4.2@328.71,1406.42 ; C22.2@520.09,1474.27 521.59,1475.77 C22.2@521.59,1476.73 v1(585.66,1476.73) 615.28,1476.73 U6.1@615.28,1447.81 ; v1(662.91,1240) R21.1@662.91,1273.99 ; v1(710,1240.5) R24.1@710,1274.5 ; D50.3@758.81,384.94 v1(758.81,528.08) ; v1(909.46,407) C78.2@909.46,439.09 ; v1(959.46,306.2) R120.1@959.46,337.5 ; C44.1@1095.71,3958.88 v1@1095.71,3986.5 ; R123.2@1105,905.63 v1(1105,945) ; R51.1@1317,3989.72 v1(1317,4017.34) ; v1(1505.83,1876.87) C37.2@1505.83,1914.8 ; v1(1543.07,1437.25) Q5.2@1576.98,1437.25 ; C39.1@1575.39,3326.86 v1(1575.39,3370) ; R56.1@1661.53,1474.39 v1(1661.53,1505) ; v1(1720,3077.86) U10.4@1787.99,3077.86 ; C41.1@1787.99,3326.86 v1(1787.99,3370) ; v1(1964.69,3155.12) C40.1@1964.69,3190.86 ; v1(2164.43,1437.25) Q6.2@2198.34,1437.25 ; R57.1@2282.88,1474.39 v1(2282.88,1505) ; v1(2788.57,1437.25) Q7.2@2822.48,1437.25 ; R58.1@2907.03,1474.39 v1(2907.03,1505) ; v1(3412.73,1437.25) Q8.2@3446.63,1437.25 ; C49.2@3531,3152.06 C50.2@3531,3270.17 v1(3531,3353.96) ; R59.1@3531.18,1474.39 v1(3531.18,1505) ; C57.1@3545,3550 3545,3506.73 3556.72,3495.01 v1(3595.13,3495.01) ; v1(3577,3390.96) C53.2@3632.22,3390.96 C51.2@3765.02,3390.96 ; R113.1@4623.61,3683.44 R113.1@4623.84,3683.67 ; v1@4663.15,3683.67 v1(4663.39,3683.91) ; v1(4663.39,3776.64) 4663.39,3814.6 4672.39,3823.6 C76.1@4805.03,3823.6 ; v1(4701.67,3683.91) v1@4701.9,3683.67 ; R114.1@4742.87,3683.67 R114.1@4743.1,3683.44 ; v1(5513,3010.09) C20.1@5583.66,3010.09 ; C75.1@5530.54,3578.73 C75.1@5538.73,3586.92 ; R10.1@5980,3490 6114.22,3490 6131.72,3507.5 v1(6131.72,3536.72) ; D2.1@6012.01,3420 v1(6060.02,3420) ; R29.1@6070,1474.1 v1(6115,1474.1) ; R30.1@6070,1575 6070.45,1574.55 6114.55,1574.55 v1(6115,1574.1)
  Bottom Layer w20: R20.1@164.9,3716 164.95,3715.95 164.95,3660.05 v1@165,3660 ; U5.1@313.39,3879.66 v1(313.39,3900) ; C24.1@313.39,4003.96 v1(313.39,4042.5) ; U4.2@328.08,1405.8 328.71,1405.8 v1@359.32,1405.8 ; C25.1@395.71,3715 395.85,3714.85 395.85,3657.15 v1(396,3657) ; v1(416.19,4070) 416.19,4127.92 D42.1@427.19,4138.92 ; D42.1@416.19,4149.11 D42.1@426.38,4138.92 ; v1(453.73,3657) C26.1@453.73,3715 ; v1(566.76,4070) D44.1@566.76,4138.92 ; R25.1@577.04,2583.33 v1@577.04,2554.98 ; R87.1@599.72,4370.33 599.86,4370.47 599.86,4409.86 v1(600,4410) ; U7.1@634.87,2752.11 v1(634.87,2781.34) ; v1@634.91,2554.98 R22.1@634.91,2583.33 ; D38.1@681.57,4103.81 716.68,4138.92 v1(810,4138.92) D40.1@867.26,4138.92 v1(924.02,4138.92) v1(1117.3,4138.92) ; R83.1@900.21,4370.14 900.35,4370.28 900.35,4409.68 v1(900.49,4409.82) ; R121.1@1059.46,478.33 v1(1059.46,527.46) U26.5@1059.46,578.83 ; R49.1@1090.25,3484.41 v1(1120,3484.41) ; D43.1@1167.75,4138.92 v1(1218.21,4138.92) ; v1@1183.02,3874.51 1183.02,3961.12 ; R86.1@1200.71,4370.14 1200.85,4370.28 1200.85,4409.68 v1(1200.99,4409.82) ; v1(1317.67,4065) D37.1@1317.67,4148.92 ; v1(1488.24,4065) D39.1@1488.24,4137.58 ; R82.1@1521.2,4370.14 1521.34,4370.28 1521.34,4409.68 v1(1521.48,4409.82) ; v1(1590,3509) C45.2@1590,3538.51 ; v1(3265,4240.22) R100.1@3265,4284.14 ; v1(3352.73,4195) C59.1@3352.73,4254.14 ; R105.1@4100,4247 v1(4140.73,4247) R104.1@4181.47,4247 ; R132.1@4293.99,4247 R131.1@4380,4247 v1(4380,4300) ; R112.2@4442.73,3498.66 C67.1@4442.73,3430 C68.1@4532.86,3430 ; v1(4524.82,270) 4524.82,315.71 ; v1(4532.86,3498.66) C68.1@4532.86,3430 ; v1(4623,3498.66) C69.1@4623,3430 ; R113.1@4623.84,3683.67 v1@4663.15,3683.67 ; J17.2@4648.91,195.38 C19.1@4648.91,457.47 ; v1(4691.66,3430) C69.1@4623,3430 ; v1@4701.9,3683.67 R114.1@4742.87,3683.67 ; J17.1@4849.46,195.38 C18.1@4849.46,457.47 ; v1(5275,4255) D4.2@5356.71,4255 ; v1(5275,4288.28) D4.2@5356.71,4288.28 ; v1(5275,4321.56) D4.2@5356.71,4321.56 ; C75.1@5538.73,3586.92 5553.74,3586.92 5573.74,3566.92 v1(5573.74,3538.31) ; v1(5650.3,3538.31) 5650.3,3566.92 5670.3,3586.92 C74.1@5686,3586.92 ; C21.1@5860,2858.53 C10.1@5924.89,2858.53 6009.89,2858.53 C9.1@6029.89,2838.53 6029.89,2775.34 v1(5970.78,2775.34) ; v1(5924.33,3840) C4.1@5924.33,3889.13 ; U2.2@5987.73,4180.1 v1(5987.73,4225) ; C5.1@6067.73,3586.91 6079.64,3575 v1(6170,3575) C7.1@6170,3611.65 ; C7.1@6170.26,3611.92 C6.1@6227.73,3611.92 ; v1@577.04,2554.98 v1(577.07,2554.94) ; C68.1@4532.86,3430 C69.1@4623,3430
  Bottom Layer w25: U11.7@765.57,3484.41 U11.9@837.5,3484.41 ; v1(952,3740.93) C43.1@1020.93,3740.93 ; v1(1637.73,3950) D36.1@1637.73,4074.08 ; v1(1715.31,3950) D32.2@1715.31,4012.07 ; v1(1715.31,4190) D35.1@1715.31,4221.52 ; v1(1837.73,3950) D30.1@1837.73,4074.08 ; v1(1915.31,3950) D26.2@1915.31,4012.07 ; v1(1915.31,4190) D29.1@1915.31,4221.52 ; v1(2037.73,3950) D24.1@2037.73,4074.08 ; v1(2115.31,3950) D20.2@2115.31,4012.07 ; v1(2115.31,4190) D23.1@2115.31,4221.52 ; v1(2237.73,3950) D18.1@2237.73,4074.08 ; v1(2315.31,3950) D14.2@2315.31,4012.07 ; v1(2315.31,4190) D17.1@2315.31,4221.52 ; v1(2437.73,3950) D34.1@2437.73,4074.08 ; v1(2515.31,3950) D31.2@2515.31,4012.07 ; v1(2515.31,4190) D33.1@2515.31,4221.52 ; v1(2637.73,3950) D28.1@2637.73,4074.08 ; v1(2715.31,3950) D25.2@2715.31,4012.07 ; v1(2715.31,4190) D27.1@2715.31,4221.52 ; v1(2837.73,3950) D22.1@2837.73,4074.08 ; v1(2915.31,3950) D19.2@2915.31,4012.07 ; v1(2915.31,4190) D21.1@2915.31,4221.52 ; v1(3037.73,3950) D16.1@3037.73,4074.08 ; v1(3115.31,3950) D13.2@3115.31,4012.07 ; v1(3115.31,4190) D15.1@3115.31,4221.52
  Bottom Layer w30: C42.2@1021,3678 C43.1@1021,3741 ; D7.2@5530.54,3456.3 C75.1@5530.54,3578.73
  other v1: 157.85,67.85 6141.37,67.85 94.21,94.21 221.49,94.21 6077.73,94.21 6205.01,94.21 67.85,157.85 6231.37,157.85 94.21,221.49 221.49,221.49 6077.73,221.49 6205.01,221.49 622.63,674.63 675,674.63 622.63,737.91 675,737.91 5116.79,797.81 5155.07,797.81 5193.35,797.81 5231.63,797.81 622.63,801.19 675,801.19 622.63,864.48 675,864.48 727.37,864.48 4683.44,910 4741.72,910 4800,910 622.63,927.76 675,927.76 727.37,927.76 779.73,927.76 4683.44,967.37 4741.72,967.37 4800,967.37 4683.44,1024.73 4741.72,1024.73 4800,1024.73 358.32,1406.56 615.66,1476.73 2940,2180.98 3548.73,2335.16 3597.01,2335.16 3500.45,2382.53 3548.73,2382.53 3597.01,2382.53 3500.45,2429.89 3548.73,2429.89 3597.01,2429.89 5533.72,2541.72 5572,2541.72 634.95,2554.94 5572,2580 5970.78,2660.49 6088,2660.49 5970.78,2698.78 6088,2698.78 5970.78,2737.06 6088,2737.06 6088,2775.34 5513,2971.8 4950.72,2995 5513,3048.37 3690.9,3084.01 2564.07,3137.36 2701.29,3137.36 2564.07,3175.64 2701.29,3175.64 2564.07,3213.93 2701.29,3213.93 4803.94,3241.11 4842.22,3241.11 4918.79,3241.11 3604.05,3245.49 2564.07,3252.21 2701.29,3252.21 6198,3255 3604.05,3294.86 6198,3331.56 6098.3,3420 840.34,3434.21 888.62,3434.21 888.62,3481.58 6170,3536.72 5612.02,3538.31 5612.02,3575.68 165,3657 4663.39,3739.27 4701.67,3739.27 4701.67,3776.64 5858.08,3840 5891.36,3840 1183.02,3864.51 5824.8,3879.07 5858.08,3879.07 4534.49,3982.03 1105.71,3986.5 1183.02,3986.5 4534.49,4058.59 94.21,4502.92 6077.72,4502.92 6205,4502.92 67.85,4566.56 6231.36,4566.56 94.21,4630.2 221.49,4630.2 6077.72,4630.2 6205,4630.2 157.85,4656.56 6141.36,4656.56
I2C_SCL: J4.3 R34.1 R44.2 U8.11 U9.22 U12.7 U21.10 | length 7288.1
  Top Layer w10: v1(1287.94,3723) 1287.94,3152.06 1312.14,3127.86 v1(1371.05,3127.86) ; v1(4013.55,2158) 4189,2158 4250,2219 4250,3324.05 4281.97,3356.02 5081.35,3356.02 5105.1,3379.77 J4.3@5105.1,3518.73
  Top Layer w15: U9.22@2997.73,2217.58 v1(3052.58,2217.58) ; R34.1@3158.08,2177.53 3258.29,2177.53 U8.11@3263.29,2182.53 v1(3322.12,2182.53)
  Bottom Layer w10: U12.7@1222,3907.97 1271.89,3907.97 1287.94,3891.92 v1(1287.94,3723) 1287.94,3697.62 1299.92,3685.64 U21.10@1330.91,3685.64 ; v1(1371.05,3127.86) 1371.05,2278.58 1432.78,2216.85 3051.85,2216.85 v1(3052.58,2217.58) 3309.55,2217.58 3322.12,2205 v1(3322.12,2182.53) 3322.12,2123.66 3334.78,2111 3607.4,2111 3654.4,2158 v1(4013.55,2158)
  Bottom Layer w15: v1(1371.05,3127.86) R44.2@1446.45,3127.86
I2C_SCL_EXP: J6.5 J6.6 J7.1 J7.2 R32.1 U8.25 | length 6351.3
  Top Layer w10: U8.25@3832.74,1983.56 U8.25@3832.98,1983.32 3832.98,1830.63 3857.08,1806.52 4475.71,1806.52 4989.03,2319.84 5678.48,2319.84 5780.55,2217.76 5847.95,2217.76 J7.1@5896.19,2266
  Top Layer w15: U8.25@3832.74,1983.56 v1(3832.74,2060.2)
  Bottom Layer w10: J6.5@397.3,2265.99 437.66,2225.63 884.47,2225.63 1049.89,2060.2 v1(3832.74,2060.2) 3833.14,2059.8 3833.14,2008.08 R32.1@3833.55,2007.67
  Bottom Layer w20: J6.6@297.3,2265.99 J6.5@397.3,2265.99 ; J7.1@5896.19,2266 J7.2@5996.19,2266
I2C_SDA: J4.4 R33.1 R45.2 U8.12 U9.23 U12.8 U21.9 | length 7562.8
  Top Layer w10: v1(1252.68,3723) 1252.68,3108.14 1282.95,3077.86 v1(1403.15,3077.86) ; v1(4061.34,2132.53) 4192.53,2132.53 4270,2210 4270,3317.95 4287.07,3335.02 5178.48,3335.02 5205.1,3361.64 J4.4@5205.1,3518.73
  Top Layer w15: v1(2940,2243.17) U9.23@2997.73,2243.17 ; R33.1@3158.08,2127.53 3258.29,2127.53 U8.12@3263.29,2132.53 3263.47,2132.35 3365.26,2132.35 3375.29,2142.37 v1(3375.29,2182.53)
  Bottom Layer w10: U12.8@1222,3888.29 1245.58,3888.29 1252.68,3881.19 v1(1252.68,3723) 1252.68,3683 1271.5,3664.18 1317.76,3664.18 1318.63,3665.05 1346.01,3665.05 U21.9@1346.91,3665.96 ; v1(1403.15,3077.86) 1403.15,2293.67 1453.32,2243.5 2002.66,2243.5 2003,2243.17 v1(2940,2243.17) 3363.12,2243.17 3375.29,2231 v1(3375.29,2182.53) 3375.29,2149.71 3389,2136 3587,2136 3646.25,2195.25 4034.25,2195.25 4061.34,2168.16 v1(4061.34,2132.53)
  Bottom Layer w15: v1(1403.15,3077.86) R45.2@1446.45,3077.86
I2C_SDA_EXP: J6.3 J6.4 J7.3 J7.4 R31.1 U8.24 | length 6319.5
  Top Layer w10: U8.24@3782.74,1983.56 U8.24@3782.98,1983.32 3782.98,1810.79 3808.54,1785.23 4484.93,1785.23 5000.25,2300.55 5670.09,2300.55 5774.67,2195.97 5849.74,2195.97 5879.72,2166 J7.3@5896.19,2166
  Top Layer w15: U8.24@3782.74,1983.56 v1(3782.74,2036.39)
  Bottom Layer w10: J6.3@397.3,2165.99 436.74,2205.44 874.81,2205.44 1043.85,2036.39 v1(3782.74,2036.39) 3783.14,2035.98 3783.14,2008.08 R31.1@3783.55,2007.67
  Bottom Layer w20: J6.4@297.3,2165.99 J6.3@397.3,2165.99 ; J7.3@5896.19,2166 J7.4@5996.19,2166
IN_1: D15.2 J19.1 R66.1 | length 251.5
  Bottom Layer w20: R66.1@3037.73,4345.54 D15.2@3115.31,4345.54 J19.1@3115.31,4519.47
IN_2: D21.2 J19.2 R70.1 | length 251.5
  Bottom Layer w20: R70.1@2837.73,4345.54 D21.2@2915.31,4345.54 J19.2@2915.31,4519.47
IN_3: D27.2 J19.3 R74.1 | length 251.5
  Bottom Layer w20: R74.1@2637.73,4345.54 D27.2@2715.31,4345.54 J19.3@2715.31,4519.47
IN_4: D33.2 J19.4 R78.1 | length 233.9
  Bottom Layer w20: R78.1@2437.73,4345.54 D33.2@2515.31,4345.54 J19.4@2515.31,4501.81
IN_5: D17.2 J19.5 R67.1 | length 251.5
  Bottom Layer w20: R67.1@2237.73,4345.54 D17.2@2315.31,4345.54 J19.5@2315.31,4519.47
IN_6: D23.2 J19.6 R71.1 | length 251.5
  Bottom Layer w20: R71.1@2037.73,4345.54 D23.2@2115.31,4345.54 J19.6@2115.31,4519.47
IN_7: D29.2 J19.7 R75.1 | length 233.9
  Bottom Layer w20: R75.1@1837.73,4345.54 D29.2@1915.31,4345.54 J19.7@1915.31,4501.81
IN_8: D35.2 J19.8 R79.1 | length 251.5
  Bottom Layer w20: R79.1@1637.73,4345.54 D35.2@1715.31,4345.54 J19.8@1715.31,4519.47
IO0: C34.2 J3.5 SW3.3 SW3.4 U8.27 | length 1268.8
  Top Layer w15: U8.27@3952.27,2032.53 3952.27,1960.8 3981.8,1931.27 v1(4149.99,1931.27) SW3.3@4200.84,1931.27 SW3.4@4456.74,1931.27 C34.2@4456.74,1865 ; J3.5@4053.02,2449.12 v1(4148.76,2449.12)
  Bottom Layer w10: v1@4149.38,1931.88 v1@4149.38,2448.5
  Bottom Layer w15: v1(4148.76,2449.12) v1@4149.38,2448.5 ; v1@4149.38,1931.88 v1(4149.99,1931.27)
LED: Q4.2 R36.1 U8.8 | length 3458.8
  Top Layer w15: v1(1616,1721) 1448,1721 1417,1752 1417,2477.44 1443.89,2504.33 2324.68,2504.33 2346.64,2482.37 v1(2346.64,2342) ; U8.8@3269,2342 v1(3433.46,2342)
  Bottom Layer w8: Q4.2@1607.39,1845.77 Q4.2@1615.76,1837.4
  Bottom Layer w10: v1(2346.64,2342) v1(3433.46,2342)
  Bottom Layer w15: R36.1@1555.74,1845.77 Q4.2@1607.39,1845.77 ; Q4.2@1615.76,1837.4 1615.88,1837.28 1615.88,1721.12 v1(1616,1721)
LINKLED: R88.1 U22.25 | length 2110.9
  Top Layer w10: v1(3570,3034.19) 3612.3,3034.19 U22.25@3612.54,3033.95
  Bottom Layer w10: R88.1@3540.49,4106.89 3537.99,4106.89 3527.99,4096.89 3527.99,4096.63 3509.96,4078.6 3212.92,4078.6 3182.08,4047.76 3182.08,2904.1 3208.34,2877.84 3546.73,2877.84 3568.85,2899.96 3568.85,3033.04 v1(3570,3034.19)
MCU_RX: R115.1 U8.31 | length 4039.1
  Top Layer w15: v1(3882.98,2059.8) 3882.98,2219 3896.51,2232.53 U8.31@3952.27,2232.53
  Bottom Layer w10: R115.1@1150,905.63 1150,1295.42 1181.04,1326.45 3228.66,1326.45 3290,1387.8 3290,1882.56 3311.9,1904.46 3857.06,1904.46 3882.98,1930.38 v1(3882.98,2059.8)
MCU_TX: R119.1 U8.23 | length 3685.1
  Top Layer w15: U8.23@3732.98,1983.32 3732.98,1929.45 v1(3733.27,1929.17)
  Bottom Layer w10: R119.1@1059.46,905.63 1059.46,1319.84 1088.46,1348.84 3217,1348.84 3270,1401.85 3270,1895.85 3304.53,1930.38 3732.05,1930.38 v1(3733.27,1929.17)
NetC1_1: C1.1 U1.20 | length 68.6
  Top Layer w10: C1.1@4956.22,2646.32 U1.20@5024.78,2646.32
NetC1_2: C1.2 L1.1 R127.1 U1.8 | length 346.5
  Top Layer w10: C1.2@4956.23,2685.7 U1.8@5027.99,2685.7
  Top Layer w20: R127.1@4430.66,2500.34 L1.1@4705.35,2500.34
NetC11_2: C11.2 C12.2 C13.2 C14.2 C79.1 R2.1 R129.2 U1.11
NetC15_1: C15.1 U1.19 | length 68.6
  Top Layer w10: C15.1@4956.22,2767.59 U1.19@5024.78,2767.59
NetC15_2: C15.2 L1.2 R128.1 U1.10 | length 345.2
  Top Layer w10: C15.2@4956.21,2728.22 U1.10@5026.31,2728.22
  Top Layer w20: R128.1@4430.67,2908.62 L1.2@4705.72,2908.62
NetC16_2: C16.2 U1.18 U1.21 | length 438.8
  Top Layer w10: v1(4955.03,2600.66) 4981.01,2626.64 U1.21@5025.76,2626.64 ; v1(4955.03,2813.26) 4981.01,2787.27 U1.18@5025.76,2787.27 ; C16.2@4955.03,2855.83 C16.2@4969.65,2870.45
  Top Layer w20: v1(4955.03,2813.26) C16.2@4955.03,2855.83
  Layer 2 w20: v1(4955.03,2600.66) v1(4955.03,2813.26)
NetC17_1: C17.1 U2.1 | length 72.6
  Bottom Layer w20: C17.1@5877.73,4180.1 U2.1@5950.33,4180.1
NetC19_2: C19.2 F3.1 U3.3
NetC23_2: C23.2 J2.S1 J2.S2 J2.S3 J2.S4 R11.2
NetC25_2: C25.2 C26.2 F4.1 R15.2 U5.3
NetC39_2: C39.2 D8.3 U10.8 | length 137.4
  Bottom Layer w15: D8.3@1500,3227.86 U10.8@1575.39,3227.86 C39.2@1575.39,3289.86
NetC40_2: C40.2 U10.1 X1.1 | length 289.8
  Bottom Layer w15: U10.1@1787.99,3227.86 C40.2@1964.69,3227.86 1964.69,3280.86 1955.72,3289.83 X1.1@1908.34,3289.83
NetC41_2: C41.2 U10.2 X1.4 | length 315.4
  Bottom Layer w15: U10.2@1787.99,3177.86 1730,3177.86 1720,3187.86 1720,3270 1739.86,3289.86 C41.2@1787.99,3289.86 X1.4@1872.88,3289.86
NetC57_2: C57.2 R89.1 T1.2 | length 175.9
  Top Layer w10: v1(3595.13,3609.67) v1@3595.27,3609.81
  Top Layer w20: v1@3595.27,3609.81 T1.2@3595.27,3685.49
  Bottom Layer w20: C57.2@3545,3610 R89.1@3645,3610
NetC59_2: C59.2 J21.13 J21.14 R100.2
NetC60_1: C60.1 R104.2 | length 80.4
  Bottom Layer w20: C60.1@4181.47,4106.64 R104.2@4181.47,4187
NetC60_2: C60.2 D46.3 T1.15 | length 992.1
  Top Layer w20: T1.15@3595.4,4016.34 3595.4,4140 3615.4,4160 4160,4160 4181.47,4138.53 D46.3@4181.47,4006.64
  Top Layer w30: v1(4181.47,3940) D46.3@4181.47,4006.64
  Bottom Layer w30: v1(4181.47,3940) C60.2@4181.47,4006.64
NetC61_1: C61.1 R105.2 | length 147.6
  Bottom Layer w20: C61.1@4023.99,4106.64 4023.99,4172 4038.99,4187 R105.2@4100,4187
NetC61_2: C61.2 D46.4 T1.10 | length 502.8
  Top Layer w20: T1.10@3845.4,4016.34 3845.4,4100 3865.4,4120 3999.41,4120 4023.99,4095.42 D46.4@4023.99,4006.64
  Top Layer w30: v1(4023.99,3940) D46.4@4023.99,4006.64
  Bottom Layer w30: v1(4023.99,3940) C61.2@4023.99,4006.64
NetC62_2: C62.2 U22.22 | length 86.3
  Top Layer w10: C62.2@3469.81,3126.08 3476.1,3132.38 U22.22@3553.48,3132.38
NetC63_2: C63.2 U22.20 | length 86.6
  Top Layer w10: C63.2@3469.81,3178.84 3476.89,3171.75 U22.20@3553.48,3171.75
NetC64_2: C64.2 R102.1 U22.30 X2.1 | length 299.5
  Top Layer w10: X2.1@3643.53,2845.79 X2.1@3658.51,2830.81 3677.13,2849.43 3681.59,2849.43 3701.45,2869.29 3701.45,2957.41 3710.96,2966.93 U22.30@3710.96,3033.95
  Top Layer w15: C64.2@3592.66,2845.79 X2.1@3643.53,2845.79
NetC65_2: C65.2 R102.2 U22.31 X2.3 | length 205.4
  Top Layer w10: U22.31@3730.65,3033.95 3730.65,2965.94 3738.81,2957.78 R102.2@3738.81,2954.28
  Top Layer w15: R102.2@3738.81,2954.28 3738.81,2904.05 X2.3@3745.12,2897.74 3760.08,2882.78 C65.2@3802.15,2882.78
NetC66_1: C66.1 D48.1 L4.1 U24.8 | length 120
  Top Layer w20: C66.1@4749.03,3900 D48.1@4749.03,4020
NetC66_2: C66.2 U24.1 | length 158.9
  Top Layer w20: U24.1@4576.43,3833.44 4576.43,3882.5 4593.93,3900 C66.2@4679.03,3900
NetC67_2: C67.2 C68.2 C69.2 C86.1 R106.2 U24.2
  other v1: 4601.02,3253.53 4639.3,3253.53 4601.02,3290.9 4639.3,3290.9 4510,3792.27 4510,3829.64 4510,3867 4510,3904.37
NetC71_1: C71.1 C72.1 D49.1 FB5.2 R111.1 U25.4 U25.9 | length 53
  Top Layer w20: C71.1@4181.47,3551 FB5.2@4181.47,3604
  other v1: 4263.58,3453.2 4301.86,3453.2 4263.58,3490.57 4301.86,3490.57
NetC71_2: C71.2 C72.2 D49.2 FB4.2 R106.1 R108.2 U25.1 | length 53
  Top Layer w20: C71.2@4121.47,3551 FB4.2@4121.47,3604
  other v1: 4396.03,3175 4434.32,3175 4396.03,3212.36 4434.32,3212.36 4036.55,3555.42 4074.83,3555.42 4036.55,3592.79 4074.83,3592.79
NetC73_1: C73.1 C74.2 C75.2 F7.1 L4.2 R109.2 | length 991.8
  Layer 2 w20: v1(4670,3617.53) 5465.56,3617.53 5500.18,3652.15 v1(5500.18,3752.83)
  Bottom Layer w20: v1(4670,3617.53) R109.2@4716.6,3617.53
  other v1: 5538.47,3752.83 5576.75,3752.83 5500.18,3790.19 5538.47,3790.19 5576.75,3790.19 5500.18,3827.56 5538.47,3827.56 5576.75,3827.56
NetC76_2: C76.2 R110.2 U24.6 | length 149.7
  Top Layer w20: U24.6@4789.03,3733.44 4789.16,3733.57 4845.24,3733.57 v1(4845.38,3733.71)
  Bottom Layer w15: R110.2@4803.1,3738.53 4804.06,3739.49 4804.06,3785.63 C76.2@4805.03,3786.6 C76.2@4805.03,3786.6
  Bottom Layer w20: R110.2@4803.1,3738.53 4807.92,3733.71 v1(4845.38,3733.71)
NetC77_2: C77.2 R110.1 | length 48.1
  Bottom Layer w15: R110.1@4743.1,3738.53 C77.2@4743.1,3786.6
NetC80_1: C80.1 R125.2 | length 53.1
  Top Layer w20: R125.2@5046.59,2924.45 C80.1@5099.73,2924.45
NetC80_2: C80.2 U1.15 | length 63
  Top Layer w10: U1.15@5089.73,2801.45 C80.2@5089.73,2864.45
NetC81_2: C81.2 R127.2 | length 55
  Top Layer w20: R127.2@4430.66,2560.34 C81.2@4430.67,2615.34
NetC82_1: C82.1 R128.2 | length 56.8
  Top Layer w20: C82.1@4430.66,2791.82 R128.2@4430.67,2848.62
NetC83_1: C83.1 R130.1 U1.13 | length 279.9
  Top Layer w10: U1.13@5134.03,2787.27 5207.39,2787.27 5226.19,2806.07 5226.19,2873.5 5254.1,2901.41 5256.72,2901.41 C83.1@5266.72,2911.41
  Top Layer w20: C83.1@5266.72,2911.41 R130.1@5266.72,2967.7
NetC83_2: C83.2 R129.1 U1.12 | length 198.1
  Top Layer w10: U1.12@5135.01,2767.59 5236.91,2767.59 R129.1@5266.72,2797.4
  Top Layer w20: R129.1@5266.72,2797.4 C83.2@5266.72,2851.41
NetC84_1: C84.1 R131.2 | length 141.5
  Bottom Layer w20: R131.2@4380,4187 4433.85,4187 4451.47,4169.38 C84.1@4451.47,4106.64
NetC84_2: C84.2 D47.3 J21.7 J21.8 | length 1205.6
  Top Layer w20: J21.8@3860.95,4437.31 3860.96,4382.64 3880.97,4362.62 4420.97,4362.62 4451.47,4332.12 D47.3@4451.47,4006.64
  Top Layer w30: v1(4451.47,3940) D47.3@4451.47,4006.64
  Bottom Layer w20: J21.7@3820.79,4507.39 J21.8@3860.95,4437.31
  Bottom Layer w30: v1(4451.47,3940) C84.2@4451.47,4006.64
NetC85_1: C85.1 R132.2 | length 80.4
  Bottom Layer w20: C85.1@4293.99,4106.64 R132.2@4293.99,4187
NetC85_2: C85.2 D47.4 J21.4 J21.5 | length 1202.1
  Top Layer w20: J21.4@3700.32,4437.31 3700.32,4350 3736.59,4313.74 4268.32,4313.74 4293.99,4288.07 D47.4@4293.99,4006.64
  Top Layer w30: v1(4293.99,3940) D47.4@4293.99,4006.64
  Bottom Layer w20: J21.4@3700.32,4437.31 J21.5@3740.49,4507.39
  Bottom Layer w30: v1(4293.99,3940) C85.2@4293.99,4006.64
NetD1_1: D1.1 D4.1 | length 195.1
  Bottom Layer w50: D4.1@5357.73,4106.16 D1.1@5552.84,4106.16
NetD7_1: D7.1 Q2.1 R9.1
NetD8_2: D8.2 J5.1 | length 206.5
  Top Layer w20: v1(1370.79,3264.74) 1443.92,3264.74 1490.45,3218.21 J5.1@1490.45,3201.34
  Bottom Layer w20: v1(1370.79,3264.74) 1371.05,3265 1420.99,3265 D8.2@1421.26,3265.27
NetD9_1: D9.1 K1.1 LED8.2 Q5.3 | length 2304.5
  Top Layer w15: K1.1@1592.28,1573.63 1418.33,1573.63 1381.63,1610.33 1381.63,2492.83 1423.59,2534.79 2270,2534.79 2293.03,2557.81 LED8.2@2293.03,2644.57
  Bottom Layer w15: Q5.3@1592.73,1482.53 K1.1@1592.73,1573.19
  Bottom Layer w20: K1.1@1592.28,1573.63 D9.1@1672.73,1573.63
NetD10_1: D10.1 K2.1 LED9.2 Q6.3 | length 1645.7
  Top Layer w15: K2.1@2213.64,1573.63 2022.05,1573.63 1985.01,1610.67 1985.01,2449.99 2010.03,2475 2270,2475 2293.24,2451.76 LED9.2@2293.24,2388.68
  Bottom Layer w15: Q6.3@2214.08,1482.53 K2.1@2214.08,1573.19
  Bottom Layer w20: K2.1@2213.64,1573.63 D10.1@2294.09,1573.63